# Altium PCB Standby_PS_V2..PcbDoc (part 1 of 2)
Units mm, origin at the board's own origin, x right, y up, seen from the top; angles counter-clockwise.
Board outline 250 x 85 mm, 2 copper layers (Top Layer, Bottom Layer), stack 1.071 mm thick; 195 components, 81 nets, 445 pads, 21 vias.
Unrouted connection lines stored in the file: 2.
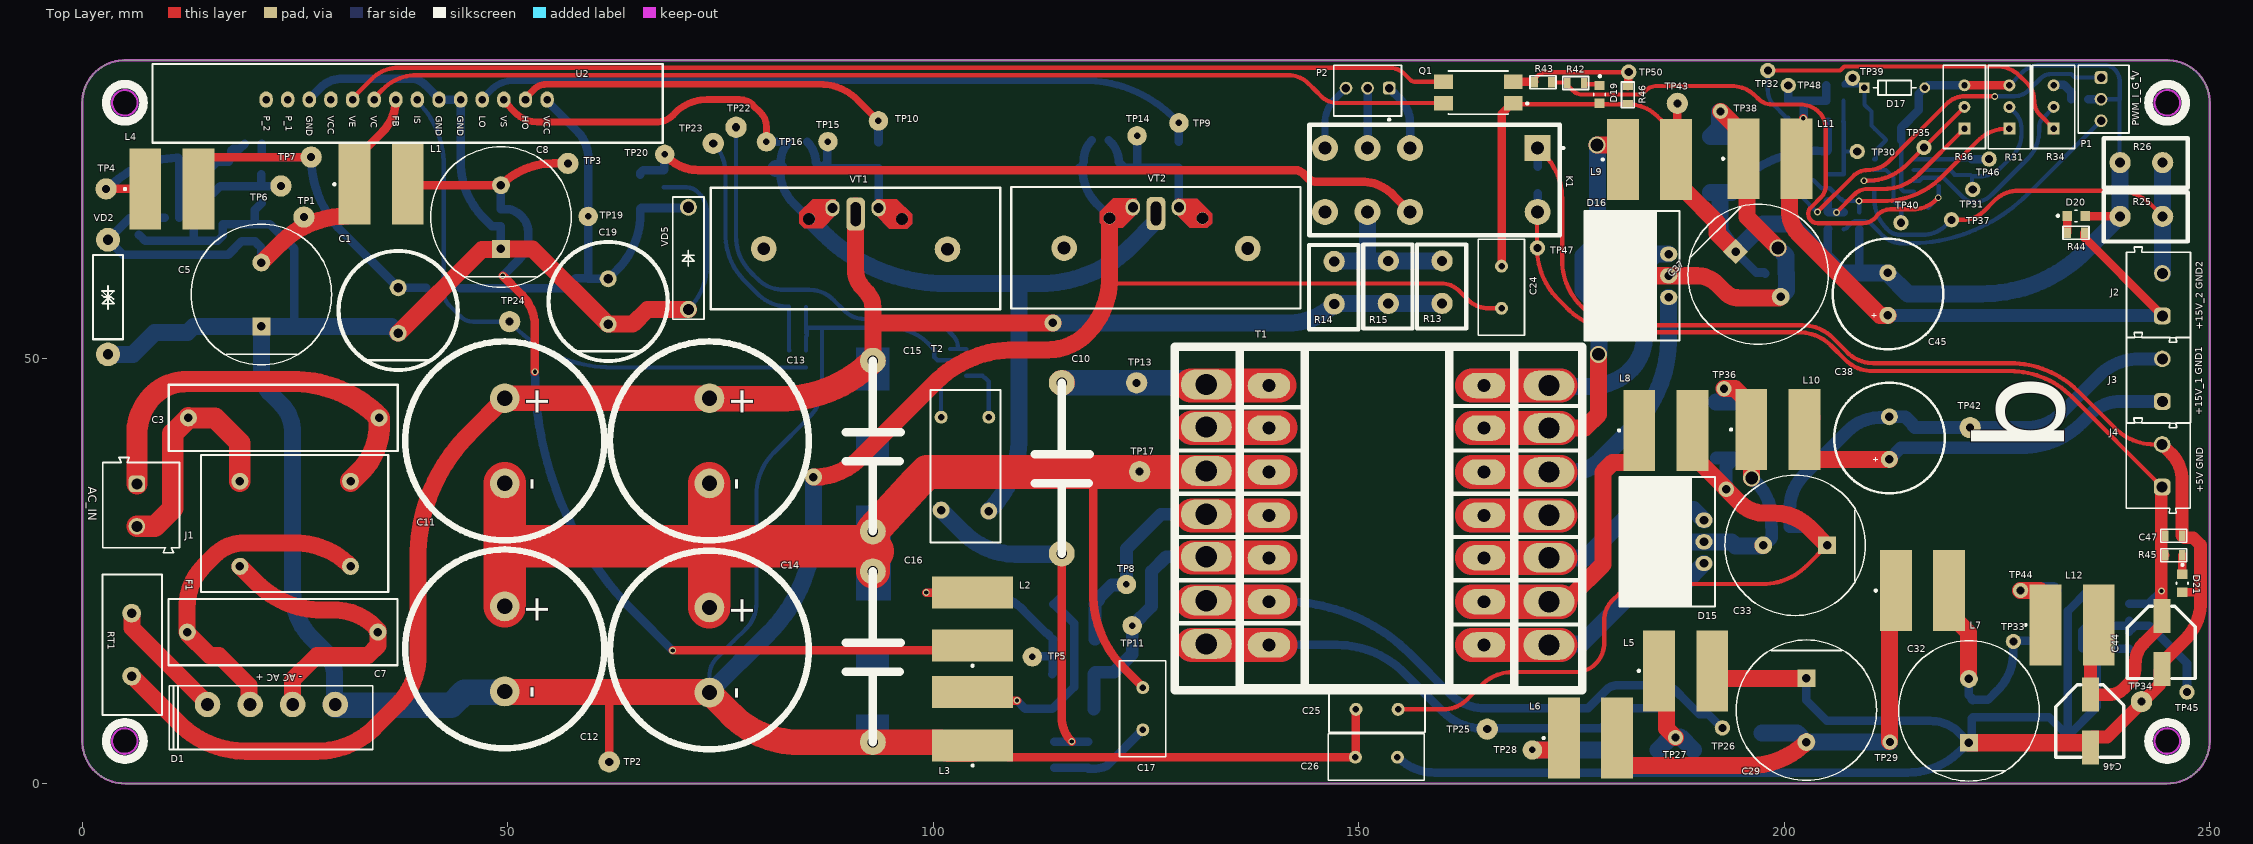
[diagram p0: Top Layer view]
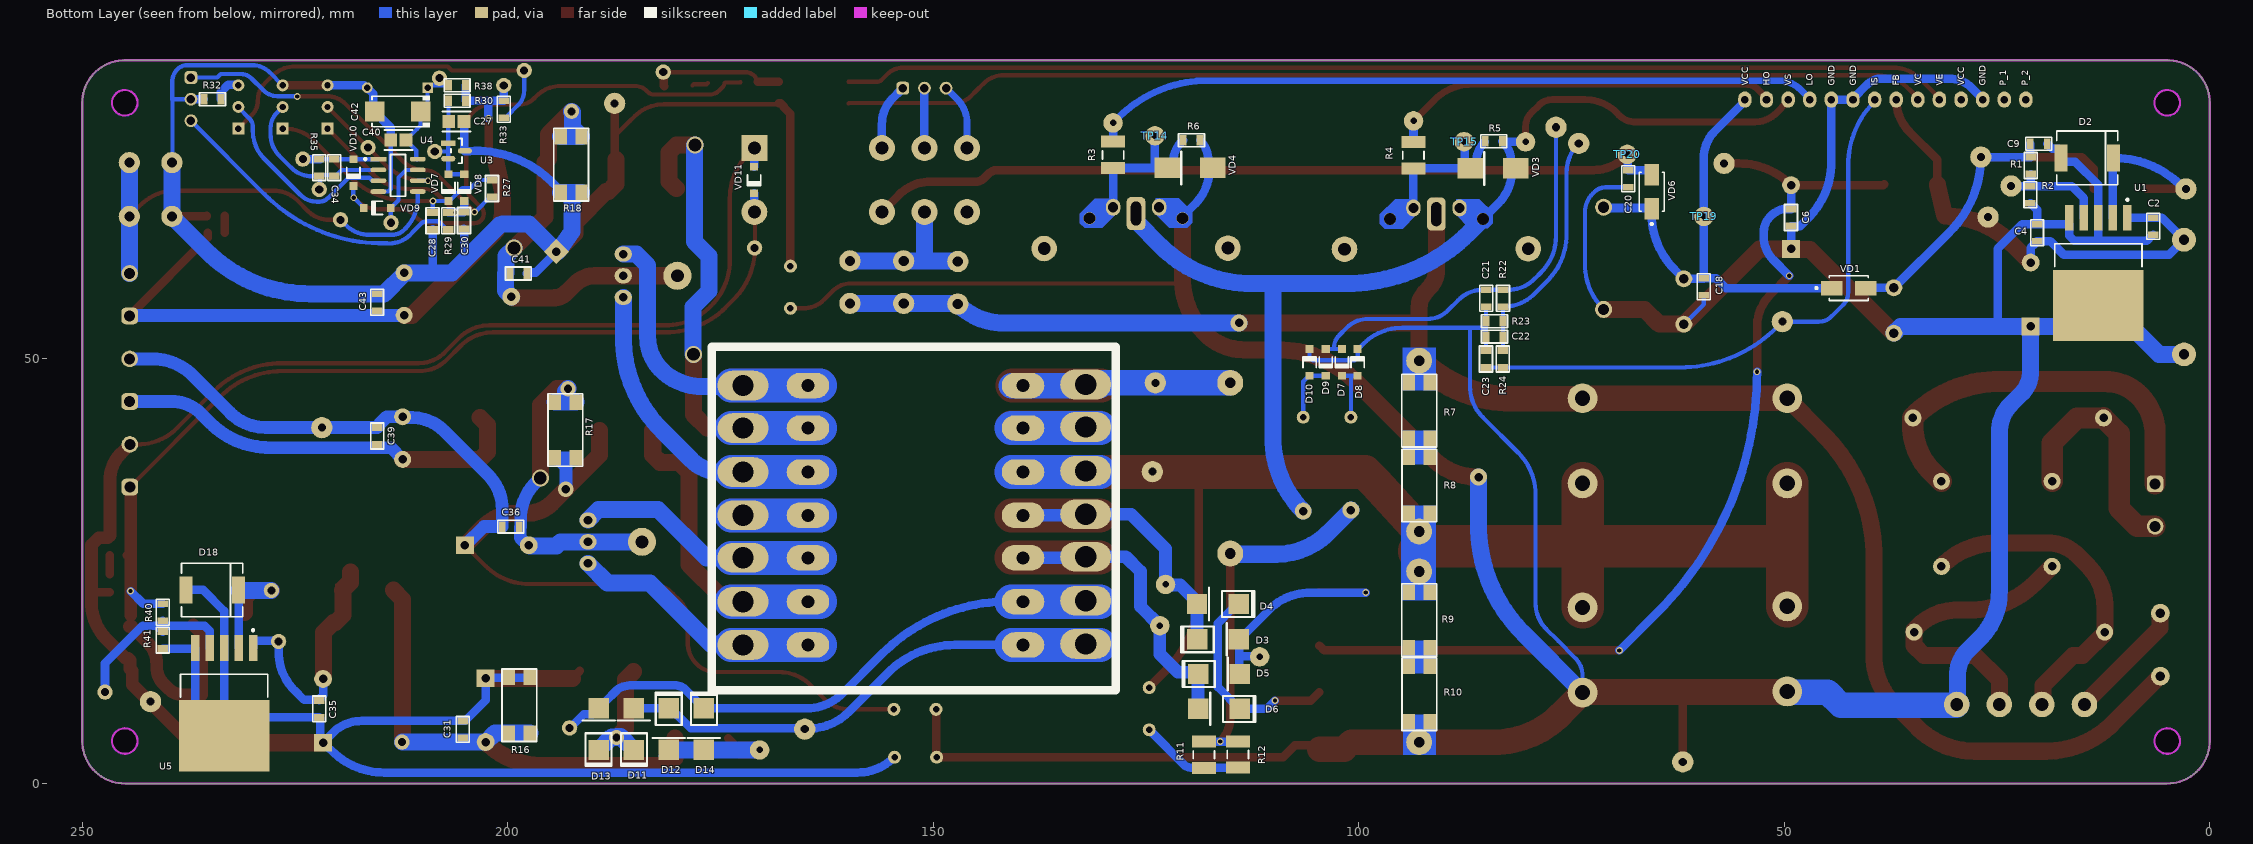
[diagram p1: Bottom Layer view, seen from below]
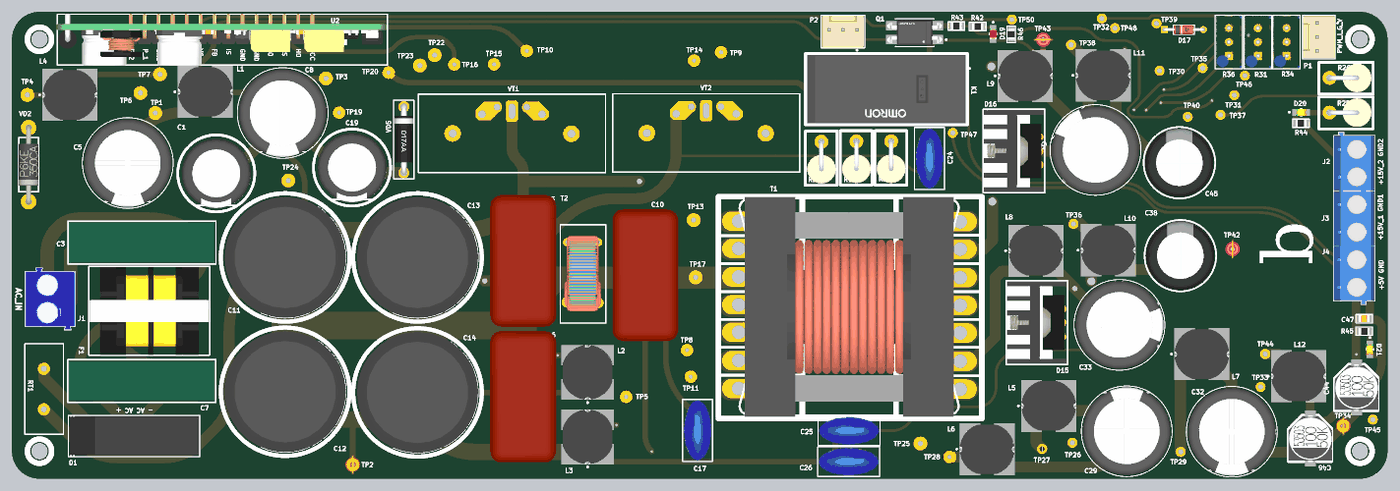
[diagram p3: 3D render of the assembled board from above, using the file's embedded part models]
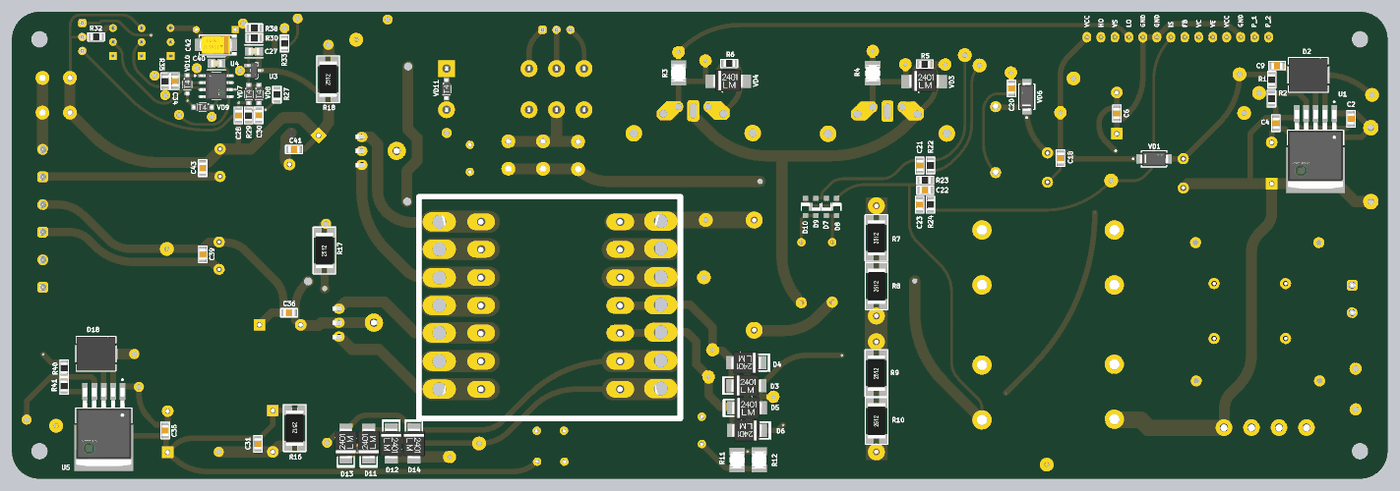
[diagram p4: 3D render of the assembled board from below, using the file's embedded part models]

## Layer stack, top to bottom
Top Solder: solder mask 0.0102, Solder Resist, Dk 3.5
Top Layer: signal copper 0.0356
Dielectric 1: dielectric 1, FR-4, Dk 4.8
Bottom Layer: signal copper 0.0356
Bottom Solder: solder mask 0.0102, Solder Resist, Dk 3.5

## Board outline
0,5 0,80.029 0,80 cw(c5,80) 5,85 245,85 cw(c245,80) 250,80 250,4.95 250,5 cw(c245,5) 245,0 5,0 cw(c5,5)
cut-out: 243.5,80 ccw(c245,80) 245,78.5 ccw(c245,80) 246.5,80 ccw(c245,80) 245,81.5 ccw(c245,80)
cut-out: 243.5,5 ccw(c245,5) 245,3.5 ccw(c245,5) 246.5,5 ccw(c245,5) 245,6.5 ccw(c245,5)
cut-out: 5,78.5 cw(c5,80) 3.5,80 cw(c5,80) 5,81.5 cw(c5,80) 6.5,80 cw(c5,80)
cut-out: 3.5,5 ccw(c5,5) 5,3.5 ccw(c5,5) 6.5,5 ccw(c5,5) 5,6.5 ccw(c5,5)

## Design rules (kind name [scope] priority, off if disabled: settings)
Clearance Clearance_1 [All vs InNet('GND_1')] p1: gap=0.2 ignorepadtopadclearanceinfootprint=FALSE
Clearance [All vs InNet('GND')] p2: gap=0.4 ignorepadtopadclearanceinfootprint=FALSE except(0.2: Arc-Hole SMDPad-SMDPad SMDPad-THPad SMDPad-Via SMDPad-Fill SMDPad-Poly SMDPad-Region SMDPad-Text SMDPad-Hole THPad-THPad THPad-Via THPad-Fill THPad-Poly THPad-Region THPad-Text THPad-Hole Text-Text Text-Hole)
ComponentClearance [All] p1: gap=-3 collisioncheckmode=3 verticalgap=0.254 showdistances=FALSE
DiffPairsRouting [All] p1: maxlimit=0.254 minlimit=0.254 mostfreqgap=0.254 substack1={A23D90DD-733B-49C5-8102-56B3D284E3A0} toplayer_{a23d90dd-733b-49c5-8102-56b3d284e3a0}_minwidth=0.381 toplayer_{a23d90dd-733b-49c5-8102-56b3d284e3a0}_maxwidth=0.381 toplayer_{a23d90dd-733b-49c5-8102-56b3d284e3a0}_prefwidth=0.381 bottomlayer_{a23d90dd-733b-49c5-8102-56b3d284e3a0}_minwidth=0.381 bottomlayer_{a23d90dd-733b-49c5-8102-56b3d284e3a0}_maxwidth=0.381 bottomlayer_{a23d90dd-733b-49c5-8102-56b3d284e3a0}_prefwidth=0.381 toplayer_minwidth=0.381 toplayer_maxwidth=0.381 toplayer_prefwidth=0.381 bottomlayer_minwidth=0.381 bottomlayer_maxwidth=0.381 bottomlayer_prefwidth=0.381 substack2={0B3DB408-A969-412D-8C07-BA8AE97219D9} toplayer_{0b3db408-a969-412d-8c07-ba8ae97219d9}_minwidth=0.381 toplayer_{0b3db408-a969-412d-8c07-ba8ae97219d9}_maxwidth=0.381 toplayer_{0b3db408-a969-412d-8c07-ba8ae97219d9}_prefwidth=0.381 bottomlayer_{0b3db408-a969-412d-8c07-ba8ae97219d9}_minwidth=0.381 bottomlayer_{0b3db408-a969-412d-8c07-ba8ae97219d9}_maxwidth=0.381 bottomlayer_{0b3db408-a969-412d-8c07-ba8ae97219d9}_prefwidth=0.381 substack3={378827E6-B38F-4565-9D2F-710D8D441C30} toplayer_{378827e6-b38f-4565-9d2f-710d8d441c30}_minwidth=0.381 toplayer_{378827e6-b38f-4565-9d2f-710d8d441c30}_maxwidth=0.381 toplayer_{378827e6-b38f-4565-9d2f-710d8d441c30}_prefwidth=0.381 bottomlayer_{378827e6-b38f-4565-9d2f-710d8d441c30}_minwidth=0.381 bottomlayer_{378827e6-b38f-4565-9d2f-710d8d441c30}_maxwidth=0.381 bottomlayer_{378827e6-b38f-4565-9d2f-710d8d441c30}_prefwidth=0.381 substack4={1E65D4A7-266F-4925-B814-5E9C4A66F8EE} toplayer_{1e65d4a7-266f-4925-b814-5e9c4a66f8ee}_minwidth=0.381 toplayer_{1e65d4a7-266f-4925-b814-5e9c4a66f8ee}_maxwidth=0.381 toplayer_{1e65d4a7-266f-4925-b814-5e9c4a66f8ee}_prefwidth=0.381 bottomlayer_{1e65d4a7-266f-4925-b814-5e9c4a66f8ee}_minwidth=0.381 bottomlayer_{1e65d4a7-266f-4925-b814-5e9c4a66f8ee}_maxwidth=0.381 bottomlayer_{1e65d4a7-266f-4925-b814-5e9c4a66f8ee}_prefwidth=0.381 substack5={93C5D03E-862D-45F8-9871-970EEA9B3F11} toplayer_{93c5d03e-862d-45f8-9871-970eea9b3f11}_minwidth=0.381 toplayer_{93c5d03e-862d-45f8-9871-970eea9b3f11}_maxwidth=0.381 toplayer_{93c5d03e-862d-45f8-9871-970eea9b3f11}_prefwidth=0.381 bottomlayer_{93c5d03e-862d-45f8-9871-970eea9b3f11}_minwidth=0.381 bottomlayer_{93c5d03e-862d-45f8-9871-970eea9b3f11}_maxwidth=0.381 bottomlayer_{93c5d03e-862d-45f8-9871-970eea9b3f11}_prefwidth=0.381 maxuncoupledlength=12.7
Height [All] p1: minheight=0 maxheight=50 prefheight=33
HoleSize [All] p1: absolutevalues=TRUE maxlimit=6 minlimit=0.01 maxpercent=80.000 minpercent=20.000
HoleToHoleClearance [All] p1: gap=0.1 allowstackedmicrovias=TRUE
MinimumSolderMaskSliver [All] p1: minsoldermaskwidth=0.1
PlaneClearance [All] p1: clearance=0.7
PlaneConnect [All] p1: planeconnectstyle=Direct reliefexpansion=0.5 reliefentries=4 reliefconductorwidth=0.5 reliefairgap=0.15
PolygonConnect VQFN20 [HasFootprint('VQFN20')] p1: connectstyle=Direct reliefconductorwidth=0.254 reliefentries=4 polygonreliefangle="90 Angle" airgapwidth=0.254
PolygonConnect [All] p2: connectstyle=Direct reliefconductorwidth=0.3 reliefentries=4 polygonreliefangle="90 Angle" airgapwidth=0.15
RoutingVias [All] p1: holewidth=0.1 width=0.1 viastyle="Through Hole" minholewidth=0 minwidth=0.3 maxholewidth=2 maxwidth=4
ShortCircuit [All] p1: allowed=TRUE
SilkToSolderMaskClearance [IsPad] p1: minsilkscreentomaskgap=0.1 clearancetoexposedcopper=TRUE
SolderMaskExpansion SolderMaskExpansion_Via [IsVia] p1: expansion=0.102 istentingtop=TRUE
SolderMaskExpansion [All] p2: expansion=0.01 istentingtop=FALSE
UnRoutedNet [All] p1: checkbadconnections=TRUE
Width [All] p1: maxlimit=5 minlimit=0.2 preferedwidth=0.3 substack1={A23D90DD-733B-49C5-8102-56B3D284E3A0} substack2={0B3DB408-A969-412D-8C07-BA8AE97219D9} substack3={378827E6-B38F-4565-9D2F-710D8D441C30} substack4={1E65D4A7-266F-4925-B814-5E9C4A66F8EE} substack5={93C5D03E-862D-45F8-9871-970EEA9B3F11}
19 further rules are at their usual default settings.

## Components (designator, comment, footprint, x,y, rotation, side; value= is the part's Value field where it differs from the comment)
C1 "2200uF_25V" CAP_POL_13x26_1000uF_50V 37.125,55.592 r270 top locked
C2 "0.1uF" CAP-0805 6.65,65.5 r90 bottom
C3 "CAP-NON-POLAR" CAP-V15 23.675,42.975 r180 top
C4 "1uF_50V" CAP-0805 20.289,64.725 r90 bottom
C5 "1000uF 50V" FP-RAD-TH-D_16_0_5-L_25_2-MFG 21.048,57.475 r90 top
C6 "1uF_50V" CAP-0805 49.2,66.513 r270 bottom
C7 "CAP-NON-POLAR" CAP-V15 23.55,17.8 r0 top
C8 "1000uF 50V" FP-RAD-TH-D_16_0_5-L_25_2-MFG 49.2,66.575 r90 top locked
C9 "0.1uF" CAP-0805 20.1,75.2 r0 bottom
C10 "CAP-NON-POLAR" CAP_3.3uF_630V 115.1,37.063 r90 top
C11 "CAP-POLAR" "CAP 100uF_500V 22x40mm" 49.65,40.275 r270 top locked
C12 "CAP-POLAR" "CAP 100uF_500V 22x40mm" 49.65,15.825 r270 top
C13 "CAP-POLAR" "CAP 100uF_500V 22x40mm" 73.7,40.275 r270 top
C14 "CAP-POLAR" "CAP 100uF_500V 22x40mm" 73.7,15.7 r270 top locked
C15 "CAP-NON-POLAR" CAP_3.3uF_630V 92.9,39.658 r90 top
C16 "CAP-NON-POLAR" CAP_3.3uF_630V 92.9,14.9 r90 top
C17 "CAP-V" CAP-V 124.625,8.8 r90 top
C18 "1uF_50V" CAP-0805 59.45,58.375 r270 bottom
C19 "2200uF_25V" CAP_POL_13x26_1000uF_50V 61.8,56.65 r270 top
C20 "1uF 50V" CAP-0805 68.325,71.067 r90 bottom
C21 "1uF 16V" CAP-0805 85.017,57.025 r90 bottom
C22 "1UF 16V" CAP-0805 84.042,52.525 r180 bottom
C23 "1UF 16V" CAP-0805 85.042,49.9 r270 bottom
C24 "" CAP-V 166.775,58.325 r90 top
C25 "" CAP-V 152.15,8.725 r0 top
C26 "" CAP-V 152.075,3.1 r0 top
C27 "50V 1uF" FP-C0805C-DN-IPC_A 206.041,77.8 r0 bottom value="0.22 μF"
C28 "0.1uF" CAP-0805 208.841,66.125 r90 bottom
C29 "1000uF 50V" FP-RAD-TH-D_16_0_5-L_25_2-MFG 202.6,8.625 r270 top locked
C30 "0.1uF" CAP-0805 205.144,66.175 r90 bottom
C31 "1uF_50V" CAP-0805 205.3,6.365 r90 bottom
C32 "1000uF 50V" FP-RAD-TH-D_16_0_5-L_25_2-MFG 221.7,8.55 r90 top locked
C33 "1000uF 50V" FP-RAD-TH-D_16_0_5-L_25_2-MFG 201.275,28 r180 top
C34 "0.1uF" CAP-0805 220.375,72.382 r270 bottom
C35 "1uF_50V" CAP-0805 222.15,8.775 r270 bottom
C36 "0.1uF" CAP-0805 199.646,30.2 r180 bottom
C37 "1000uF 50V" FP-RAD-TH-D_16_0_5-L_25_2-MFG 196.925,59.85 r315 top locked
C38 "2200uF_25V" CAPPOL-12x25 212.35,40.6 r90 top
C39 "0.1uF" CAP-0805 215.325,40.85 r270 bottom
C40 "50V 1uF" FP-C0805C-DN-IPC_A 212.841,75.625 r0 bottom value="0.22 μF"
C41 "1uF 50V" CAP-0805 198.75,59.933 r0 bottom
C42 "CAP-POLAR" CAP-TAN-C 212.941,78.975 r0 bottom
C43 "1uF 50V" CAP-0805 215.35,56.55 r270 bottom
C44 "1000uF 6.3V" CAP_SMD_Size_E 244.375,16.535 r90 top
C45 "2200uF_25V" CAPPOL-12x25 212.175,57.525 r90 top locked
C46 "1000uF 6.3V" CAP_SMD_Size_E 235.975,7.275 r90 top
C47 "1uF_50V" CAP-0805 245.768,29.125 r0 top
D1 "RS40X" RS40X 22.225,7.8 r180 top locked
D2 "SS36" SMC/DO214AB 14.395,73.525 r0 bottom
D3 "US1G" DO-214AA#1 114.5,16.95 r0 bottom
D4 "US1G" DO-214AA#1 118.625,21.1 r180 bottom
D5 "US1G" DO-214AA#1 114.375,12.875 r0 bottom
D6 "US1G" DO-214AA#1 118.475,8.775 r180 bottom
D7 "1N4148W-7-F" DIOD-SOD123-2_V#1 101.975,49.5 r270 bottom
D8 "1N4148W-7-F" DIOD-SOD123-2_V#1 100.125,49.5 r90 bottom
D9 "1N4148W-7-F" DIOD-SOD123-2_V#1 103.875,49.5 r270 bottom
D10 "1N4148W-7-F" DIOD-SOD123-2_V#1 105.775,49.5 r90 bottom
D11 "US1G" DO-214AA#1 185.175,8.45 r270 bottom
D12 "US1G" DO-214AA#1 181.075,4.35 r90 bottom
D13 "US1G" DO-214AA#1 189.325,8.45 r270 bottom
D14 "US1G" DO-214AA#1 176.95,4.35 r90 bottom
D15 "U1620G" TO-220_Bended_Rad 187.525,28.92 r90 top
D16 "U1620G" TO-220_Bended_Rad 183.375,60.183 r90 top locked
D17 "5,6V" FP-SB-V-3906_04-031_4-MFG 212.971,81.775 r0 top
D18 "SS36" SMC/DO214AB 234.725,22.75 r0 bottom
D19 "RED" LED_RED 178.3,80.975 r270 top
D20 "GREEN" LED_GREEN 234.3,66.7 r0 top
D21 "GREEN" LED_GREEN 246.768,23.548 r270 top
F1 "FILTER" FILTER_1 25.025,30.525 r0 top
J1 "691101710002" 691101710002 6.925,32.725 r270 top
J2 "691102710002" 691102710002 243.975,57.45 r90 top locked
J3 "691102710002" 691102710002 243.975,47.4 r90 top locked
J4 "691102710002" 691102710002 243.95,37.35 r90 top locked
K1 "" Relay_F1CA005V_Omron 158.925,70.925 r180 top locked
L1 "1.2µH, 7.4A" WE-PD2_1054 35.125,70.425 r0 top
L2 "1.2µH, 7.4A" WE-PD2_1054 104.625,19.35 r90 top
L3 "1.2µH, 7.4A" WE-PD2_1054 104.625,7.625 r90 top
L4 "22µH, 2.04A" WE-PD2_1054 10.525,69.875 r0 top
L5 "1.2µH, 7.4A" WE-PD2_1054 188.416,13.25 r0 top
L6 "1.2µH, 7.4A" WE-PD2_1054 177.225,5.35 r0 top
L7 "1.2µH, 7.4A" WE-PD2_1054 216.25,22.675 r0 top
L8 "1.2µH, 7.4A" WE-PD2_1054 186.086,41.5 r0 top
L9 "1.2µH, 7.4A" WE-PD2_1054 184.175,73.325 r0 top locked
L10 "1.2µH, 7.4A" WE-PD2_1054 199.25,41.6 r0 top
L11 "1.2µH, 7.4A" WE-PD2_1054 198.325,73.425 r0 top
L12 "22µH, 2.04A" WE-PD2_1054 233.833,18.65 r0 top
P1 "61900311121" 61900311121 237.525,80.425 r90 top
P2 "61900311121" 61900311121 151.035,81.425 r0 top
Q1 "PC817XNNIP0F" FP-PC817XNNIP0F-MFG 164.05,81.2 r180 top
R1 "1K" RES-0805 21.051,72.625 r90 bottom
R2 "1K*" RES-0805 21.076,69.2 r90 bottom
R3 "22" RES_SMD_1210_IPC_A 128.867,73.875 r270 bottom
R4 "22" RES_SMD_1210_IPC_A 93.572,73.829 r270 bottom
R5 "1K" RES-0805 84.125,75.475 r180 bottom
R6 "1K" RES-0805 119.65,75.6 r180 bottom
R7 "100K" RES-2512 92.9,43.838 r90 bottom
R8 "100K" RES-2512 92.875,35.05 r90 bottom
R9 "100K" RES-2512 92.9,19.221 r90 bottom
R10 "100K" RES-2512 92.875,10.525 r90 bottom
R11 "RES_1210" RES_SMD_1210_IPC_A 118.2,3.393 r270 bottom
R12 "RES_1210" RES_SMD_1210_IPC_A 114.2,3.418 r270 bottom
R13 "15K" RES-2W_2 159.787,56.425 r270 top
R14 "15K" RES-2W_2 147.112,56.35 r270 top
R15 "15K" RES-2W_2 153.475,56.425 r270 top
R16 "100K" RES-2512 198.625,9.2 r270 bottom
R17 "100" RES-2512 193.225,41.55 r90 bottom
R18 "100" RES-2512 192.55,72.745 r90 bottom
R22 "1K*" RES-0805 83.042,57.025 r270 bottom
R23 "1K" RES-0805 84.042,54.325 r0 bottom
R24 "1K*" RES-0805 83.067,49.9 r270 bottom
R25 "1.1 Ohm***" RES-2W_2 244.461,66.65 r0 top
R26 "1.1 Ohm***" RES-2W_2 244.461,72.975 r0 top
R27 "1K" RES-0805 201.841,69.925 r90 bottom
R29 "1K" RES-0805 206.991,66.125 r90 bottom
R30 "10K" RES-0805 205.952,80.225 r180 bottom
R31 "10K" RES_Adj_3296W_Bourns 226.45,79.5 r0 top
R32 "1K*" RES-0805 234.7,80.425 r180 bottom
R33 "10K" RES-0805 200.466,79.25 r90 bottom
R34 "10K" RES_Adj_3296W_Bourns 231.65,79.51 r0 top
R35 "10K (1K)" RES-0805 222.15,72.382 r270 bottom
R36 "10K" RES_Adj_3296W_Bourns 221.175,79.51 r0 top
R38 "1K" RES-0805 205.952,82.05 r180 bottom
R40 "3K" RES-0805 240.525,20.127 r90 bottom
R41 "1K*" RES-0805 240.525,16.86 r90 bottom
R42 "1K" RES-0805 175.5,82.325 r180 top
R43 "1K" RES-0805 171.65,82.425 r180 top
R44 "2.7K" RES-0805 234.275,64.725 r0 top
R45 "1K" RES-0805 245.768,26.823 r180 top
R46 "5.1K" RES-0805 181.625,80.925 r90 top
RT1 "RES-TEMP" 10D-15 5.8,16.325 r90 top
T1 "ETD34" Transformer_ETD34 152.15,31.275 r0 top locked
T2 "Current_SENS" Current_Sense_13x7x5 103.725,37.35 r270 top
TP1 "" Test_Point#1 26.05,66.575 r0 top
TP2 "Test_Point_PCB" Pin_Test_Point(Orange) 61.925,2.55 r0 top
TP3 "" Test_Point#1 57.071,72.875 r0 top
TP4 "" Test_Point#1 2.8,69.875 r0 top
TP5 "" Test_Point#2 111.641,14.9 r90 top
TP6 "" Test_Point#1 23.35,70.225 r0 top
TP7 "" Test_Point#1 26.9,73.625 r0 top
TP8 "" Test_Point#2 122.7,23.4 r90 top
TP9 "" Test_Point#2 128.871,77.638 r90 top
TP10 "" Test_Point#2 93.562,77.875 r90 top
TP11 "" Test_Point#2 123.375,18.55 r90 top
TP13 "" Test_Point#1 123.9,47.096 r90 top
TP14 "" Test_Point#2 123.95,76.125 r90 bottom
TP15 "" Test_Point#2 87.625,75.429 r0 bottom
TP16 "" Test_Point#2 80.4,75.416 r90 top
TP17 "" Test_Point#1 124.25,36.65 r90 top
TP19 "Test_Point_PCB" Test_Point#2 59.45,66.647 r180 bottom
TP20 "Test_Point_PCB" Test_Point#2 68.45,73.939 r180 bottom
TP22 "Test_Point_PCB" Test_Point#1 76.825,77.123 r90 top
TP23 "Test_Point_PCB" Test_Point#1 74.15,75.229 r90 top
TP24 "Test_Point_PCB" Test_Point#1 50.225,54.28 r90 top
TP25 "Test_Point_PCB" Test_Point#1 165.1,6.4 r90 top
TP26 "Test_Point_PCB" Test_Point#3 192.725,6.55 r90 top
TP27 "Test_Point_PCB" Test_Point#3 187.225,5.416 r90 top
TP28 "" Test_Point#2 170.4,3.95 r180 top
TP29 "Test_Point_PCB" Test_Point#3 212.423,4.875 r270 top
TP30 "Test_Point_PCB" Test_Point#3 208.575,74.275 r90 top
TP31 "Test_Point_PCB" Test_Point#3 222.15,69.825 r90 top
TP32 "Test_Point_PCB" Test_Point#3 198.065,83.799 r90 top
TP33 "Test_Point_PCB" Test_Point#3 226.925,16.705 r270 top
TP34 "Test_Point_PCB" Pin_Test_Point(Orange) 241.975,9.625 r0 top
TP35 "Test_Point_PCB" Test_Point#3 216.408,74.743 r90 top
TP36 "Test_Point_PCB" Test_Point#3 192.925,46.4 r90 top
TP37 "Test_Point_PCB" Test_Point#3 219.65,66.25 r90 top
TP38 "Test_Point_PCB" Test_Point#3 192.5,79 r90 top
TP39 "Test_Point_PCB" Test_Point#3 208.025,82.894 r90 top
TP40 "Test_Point_PCB" Test_Point#3 213.7,65.9 r90 top
TP42 "Test_Point_PCB" Pin_Test_Point(Pink) 221.844,41.825 r0 top
TP43 "Test_Point_PCB" Pin_Test_Point(Pink) 187.439,79.93 r270 top
TP44 "" Test_Point#3 227.775,22.7 r270 top
TP45 "" Test_Point#3 247.325,10.75 r90 top
TP46 "Test_Point_PCB" Test_Point#3 224.075,73.38 r90 top
TP47 "" Test_Point#3 170.993,62.95 r270 top
TP48 "Test_Point_PCB" Test_Point#3 200.466,82.04 r90 top
TP50 "Test_Point_PCB" Test_Point#3 181.724,83.6 r90 top
U1 "" ON_Semiconductor_936A-02_MFG 13.091,60.006 r0 bottom
U2 "TL494_Ir2181" PWM_Controller_Half 68.087,82.788 r180 top
U3 "" TL431_SOT-23-3(A) 206.016,74.347 r180 bottom
U4 "LM358DR2G" FP-751-07-IPC_C 212.891,71.475 r180 bottom
U5 "" ON_Semiconductor_936A-02_MFG 233.325,9.425 r0 bottom
VD1 "US1G" US1G_SMA 42.425,58.225 r180 bottom
VD2 "P6KE40" P6KE350CA 3.025,57.175 r90 top
VD3 "SMBJ15A" DO-214AA#2 86.503,72.3 r180 bottom
VD4 "SMBJ15A" DO-214AA#2 122.125,72.35 r180 bottom
VD5 "15V" DO-017AA 71.225,61.725 r270 top
VD6 "US1G" US1G_SMA 65.575,69.548 r90 bottom
VD7 "" DIOD-SOD123-2_V#2 206.966,70.025 r270 bottom
VD8 "" DIOD-SOD123-2_V#2 205.116,70.025 r270 bottom
VD9 "" DIOD-SOD123-2_V#2 215.341,67.65 r0 bottom
VD10 "" DIOD-SOD123-2_V#2 218.141,71.8 r270 bottom
VD11 "" DIOD-SOD123-2_V#2 171.05,70.925 r270 bottom
VT1 "MOSFET-N-GDS" RAD_TO-220-TO247 90.88,62.851 r180 top locked
VT2 "MOSFET-N-GDS" RAD_TO-220-TO247 126.175,62.925 r180 top locked

## Footprints (in the part's own frame and the unit in brackets; to place one, negate y for a bottom-side part, rotate by r counter-clockwise, add the part's x,y. Pads: shape width x height; smd on the part's side, far side on the other; paste and mask are expansions set on the pad)
10D-15 [mm]
  round 2.2 hole 1.12: 1(-3.7,0) 2(3.7,0)
  silkscreen extent -8.25,-3.56 8.25,3.43, body extent -8.25,-3.5 8.25,3.5, height 21.24
61900311121 [mm] "2.54mm Male Locking Header, 3p"
  rrect50% 1.5x1.5 hole 1: 1(2.54,0.3)
  round 1.5 hole 1: 2(0,0.3) 3(-2.54,0.3)
  silkscreen extent -3.98,-3.52 3.98,2.98, body extent -3.81,-2.9 3.81,2.9, height 11.53
691101710002 [mm] "5,00mm - modular - blue - Horizontal entry with pressure clamp - 12,6mm height - 02p"
  rrect50% 1.95x1.95 hole 1.3: 1(-2.5,-0.5)
  round 1.95 hole 1.3: 2(2.5,-0.5)
  silkscreen extent -5.6,-4.5 5.6,4.5, body extent -5.6,-4.5 5.6,4.5, height 12.65
691102710002 [mm] "5,00mm - modular - blue - Horizontal entry with pressure clamp - 9,9 mm height - 02p"
  rrect50% 1.95x1.95 hole 1.3: 1(-2.5,-0.45)
  round 1.95 hole 1.3: 2(2.5,-0.45)
  silkscreen extent -5.6,-3.75 5.6,3.75, body extent -5.6,-3.75 5.6,3.75, height 9.96
"CAP 100uF_500V 22x40mm" [mm]
  round 3.5 hole 1.8: 1(-5,0) 2(5,0)
  silkscreen extent -11.68,-11.68 11.68,11.68, body extent -11,-11 11.1,11.1, height 31.53
CAP-0805 [mm]
  rect 0.8x1.25 smd mask+0.015: 1(-1,0) 2(1,0)
  silkscreen extent -1.52,-0.76 1.52,0.76, body extent -1,-0.62 1,0.63, height 0.8
CAP-TAN-C [mm]
  rect 2.3x2.3 smd: 1(-2.7,0) 2(2.7,0)
  silkscreen extent -3.8,-1.9 3,1.9, body extent -2.9,-1.6 2.9,1.6, height 2.6
CAP-V [mil]
  round 60 hole 30: 1(-97.44,0) 2(97.44,0)
  silkscreen extent -222,-106 221,108, body extent -216,-98 216,98, height 610
CAP-V15 [mm]
  round 2 hole 1: 1(-11.2,0) 2(11.2,0)
  silkscreen extent -13.4,-3.9 13.5,3.9, body extent -13.2,-3.72 13.3,3.7, height 17
CAP_3.3uF_630V [mil]
  round 120 hole 50: 1(-395,0) 2(395,0)
  silkscreen extent -395,-130 395,125, body extent -472,-236 472,236, height 804
CAP_POL_13x26_1000uF_50V [mm]
  round 2 hole 1.1: 1(-2.667,0) 2(2.667,0)
  silkscreen extent -7,-7 7,7, body extent -6.3,-6.3 6.31,6.31, height 25.72
CAP_SMD_Size_E [mm]
  rect 4x2 smd: 1(3.175,0) 2(-3.048,0)
  silkscreen extent -4.19,-3.94 4.32,4.06, body extent -4.25,-4 4.25,4, height 10.59
CAPPOL-12x25 [mm]
  round 2 hole 1: 1(-2.5,0) 2(2.5,0)
  silkscreen extent -6.5,-6.5 6.5,6.5, body extent -6.25,-6.25 6.25,6.25, height 25
Current_Sense_13x7x5 [mm]
  round 2 hole 1: 1(5.334,2.8) 2(5.207,-2.8)
  round 1.524 hole 0.762: 3(-5.7,2.8) 4(-5.7,-2.794)
  silkscreen extent -8.89,-4.06 9.02,4.19, body extent -12.58,-3.35 12.34,3.35, height 17.72
DIOD-SOD123-2_V#1 [mm] "SOD123, 2-Leads, Body 2.7x1.55mm, Height 1.45mm"
  rect 0.9x0.95 smd: 1(-1.575,0) 2(1.575,0)
  silkscreen extent -0.64,-0.83 0.64,0.77, body extent -1.35,-0.77 1.35,0.77, height 1.45
DIOD-SOD123-2_V#2 [mm] "SOD123, 2-Leads, Body 2.7x1.55mm, Height 1.45mm"
  rect 0.9x0.95 smd: 1(1.575,0) 2(-1.575,0)
  silkscreen extent -0.64,-0.82 0.64,0.77, body extent -1.88,-0.8 1.88,0.8, height 1.3
DO-017AA [mm]
  round 2 hole 1.3: 1(-6,0) 2(6,0)
  silkscreen extent -7.2,-1.85 7.15,1.83, body extent -6.63,-1.7 6.37,1.7, height 3.4
DO-214AA#1 [mm]
  rect 2.4x2.4 smd: 1(-0.381,0) 2(4.5,0)
  silkscreen extent 1.02,-1.91 6.35,1.91, body extent -0.75,-1.97 4.85,1.97, height 2.65
DO-214AA#2 [mm]
  rect 3x2.4 smd: 1(-0.381,0) 2(4.953,0)
  silkscreen extent 1.27,-1.91 1.27,1.91, body extent -0.53,-1.85 5.07,2.1, height 2.65
FILTER_1 [mm]
  round 2 hole 1: 1(-6.5,5) 2(6.5,5) 3(6.5,-5) 4(-6.5,-5)
  silkscreen extent -11.05,-8.03 10.92,8.1, body extent -10.95,-8 10.85,8, height 24.48
FP-751-07-IPC_C [mm]
  rect 1.874x0.543 smd paste+0 mask+0: 1(-2.316,1.905)
  rrect100% 1.874x0.543 smd paste+0 mask+0: 2(-2.316,0.635) 3(-2.316,-0.635) 4(-2.316,-1.905) 5(2.316,-1.905) 6(2.316,-0.635) 7(2.316,0.635) 8(2.316,1.905)
  silkscreen extent -3.98,-2.45 0.88,2.45, body extent -3,-2.45 3,2.45, height 1.75
FP-C0805C-DN-IPC_A [mm]
  rect 1.505x1.556 smd paste+0 mask+0: 1(-0.901,0) 2(0.901,0)
  silkscreen extent -1.65,-1.18 1.65,1.18, body extent -1,-0.63 1,0.63, height 0.88
FP-PC817XNNIP0F-MFG [mm]
  rect 2.2x1.7 smd paste+0 mask+0: 1(-4.1,1.27) 2(-4.1,-1.27) 3(4.1,-1.27) 4(4.1,1.27)
  silkscreen extent -5.88,-2.54 3.5,2.54, body extent -5.3,-2.64 5.3,2.64, height 0.25
FP-RAD-TH-D_16_0_5-L_25_2-MFG [mm]
  round 2.1 hole 1 paste-2539.97 mask+0: 1(3.75,0)
  rect 2.1x2.1 hole 1 paste-2539.97 mask+0: 2(-3.75,0)
  silkscreen extent -8.25,-8.25 8.25,8.25, body extent -8.35,-8.35 8.35,8.35, height 0.25
FP-SB-V-3906_04-031_4-MFG [mm]
  rect 1.25x1.25 hole 0.75 paste-2539.97 mask+0: 1(-3.55,0)
  round 1.25 hole 0.75 paste-2539.97 mask+0: 2(3.55,0)
  silkscreen extent -2.52,-0.85 2.52,0.85, body extent -4.28,-0.95 4.28,0.95, height 0.25
LED_GREEN [mm]
  rect 1.1x1.2 smd paste+0 mask+0: 1(-1.05,0) 2(1.05,0)
  silkscreen extent -2.27,-0.67 0.13,0.67, body extent -1,-0.63 1,0.63, height 0.8
LED_RED [mm]
  rect 1.1x1.2 smd paste+0 mask+0: 1(-1.05,0) 2(1.05,0)
  silkscreen extent -2.27,-0.67 0.13,0.67, body extent -1.7,-0.77 1.7,0.77, height 0.25
ON_Semiconductor_936A-02_MFG [mm]
  rect 1.016x3.05 smd paste+0 mask+0: 1(-3.404,-6.485) 2(-1.702,-6.485) 3(0,-6.485) 4(1.702,-6.485) 5(3.404,-6.485)
  rect 10.66x8.38 smd paste+0 mask+0: 6(0,3.82)
  silkscreen extent -5.12,-8.72 5.12,-0.75, body extent -5.01,-7.11 5.01,7.14, height 4.83
P6KE350CA [mm]
  round 2.8 hole 1.2: 1(-6.731,0) 2(6.731,0)
  silkscreen extent -4.95,-1.78 4.95,1.78, body extent -7.26,-1.8 7.26,1.8, height 6.9
Pin_Test_Point(Orange) [mm]
  round 2.5 hole 0.95: 1(0,0)
  body extent -1.3,-1.78 1.3,1.78, height 6.93
Pin_Test_Point(Pink) [mm]
  round 2.5 hole 0.95: 1(0,0)
  body extent -1.3,-1.78 1.3,1.78, height 6.93
PWM_Controller_Half [mil]
  oval 62x75 hole 35: 1(530,95) 2(630,95) 3(730,95) 4(830,95) 5(930,95) 6(1030,95) 7(1130,95) 8(1230,95) 9(1330,95) 10(1430,95) 11(1530,95) 12(1630,95) 13(1730,95) 14(1830,95)
  silkscreen extent -5,-70 2355,295, body extent 0,-75 2362,299, height 203
RAD_TO-220-TO247 [mm]
  round 3 hole 1.5: 0(-10.795,0.051) 0(10.795,0)
  round 1.425 hole 1.4: 1(-5.461,-3.505) 3(5.461,-3.505)
  oval 1.7x2 hole 1.2: 1(-2.692,-4.8) 3(2.718,-4.8)
  rrect50% 2.2x3.9 hole 1.2 slot 2.8 at 90 deg: 2(0,-4.064)
  Top Layer region: 2.311,-5.842 2.311,-3.988 3.886,-2.413 6.02,-2.413 6.604,-2.997 6.604,-4.267 5.029,-5.842
  Top Layer region: -4.851,-5.816 -6.629,-4.038 -6.629,-2.946 -6.045,-2.362 -3.962,-2.362 -2.413,-3.911 -2.413,-5.816
  Bottom Layer region: 2.311,-5.842 2.311,-3.988 3.886,-2.413 6.02,-2.413 6.604,-2.997 6.604,-4.267 5.029,-5.842
  Bottom Layer region: -4.851,-5.816 -6.629,-4.038 -6.629,-2.946 -6.045,-2.362 -3.962,-2.362 -2.413,-3.911 -2.413,-5.816
  silkscreen extent -16.99,-7.16 17.02,7.11, body extent -17,-7.19 17,7.19, height 25.75
Relay_F1CA005V_Omron [mil]
  rect 120x120 hole 60 paste-99999 mask+0: 1(-476.38,-147.64)
  round 120 hole 60 paste-99999 mask+0: 2(114.17,-147.64) 3(311.02,-147.64) 4(507.87,-147.64) 5(507.87,147.64) 6(311.02,147.64) 7(114.17,147.64) 8(-476.38,147.64)
  silkscreen extent -599,-255 580,255, body extent -575,-254 575,254, height 10
RES-2W_2 [mm]
  round 2.5 hole 1.2: 1(-5,0) 2(0,0)
  silkscreen extent -6.93,-2.95 2.95,2.85, body extent -5.4,-2.6 2.6,2.6, height 21.6
RES-0805 [mm]
  rect 0.8x1.25 smd mask+0.015: 1(-1,0) 2(1,0)
  silkscreen extent -1.52,-0.76 1.52,0.76, body extent -1,-0.62 1,0.63, height 0.6
RES-2512 [mm]
  rect 1.8x1.45 smd: 1(-3.275,-1.225) 1(-3.275,1.225) 2(3.275,-1.225) 2(3.275,1.225)
  silkscreen extent -4.28,-2.05 4.25,2.05, body extent -3.2,-1.6 3.2,1.6, height 0.6
RES_Adj_3296W_Bourns [mm]
  rect 1.4x1.4 hole 0.75 paste-2539.97 mask+0: 1(0,-2.54)
  round 1.4 hole 0.75 paste-2539.97 mask+0: 2(0,0) 3(0,2.54)
  silkscreen extent -2.49,-4.89 2.47,4.89, body extent -2.59,-4.99 2.57,4.99, height 0.25
RES_SMD_1210_IPC_A [mm]
  rect 1.405x2.806 smd paste+0 mask+0: 1(-1.551,0) 2(1.551,0)
  silkscreen extent -0.47,-1.25 0.47,1.25, body extent -1.6,-1.25 1.6,1.25, height 0.6
RS40X [mm]
  round 3 hole 1.5: 1(-7.5,-1.5) 2(-2.5,-1.5) 3(2.5,-1.5) 4(7.5,-1.5)
  silkscreen extent -11.9,-3.7 12,3.8, body extent -11.81,-3.55 11.81,3.55, height 19.76
SMC/DO214AB [mm]
  rect 1.52x3.2 smd: 1(-3.105,0) 2(3.105,0)
  silkscreen extent -3.6,-3.15 3.6,3.15, body extent -3.77,-3.11 3.77,3.11, height 2.62
Test_Point#1 [mm]
  round 2.5 hole 0.95: 1(0,0)
Test_Point#2 [mm]
  round 2.286 hole 0.762 paste-2539.97 mask+0.102: 1(0,0)
Test_Point#3 [mm]
  round 1.8 hole 0.95: 1(0,0)
TL431_SOT-23-3(A) [mm]
  rect 1.659x0.627 smd paste+0 mask+0: 1(-0.977,0.915)
  rrect100% 1.659x0.627 smd paste+0 mask+0: 2(-0.977,-0.915) 3(0.977,0)
  silkscreen extent -0.65,-1.45 0.65,1.45, body extent -1.2,-1.45 1.2,1.45, height 1.1
TO-220_Bended_Rad [mil]
  oval 70x80 hole 40: 1(-120,-120) 2(-20,-120) 3(80,-120)
  round 130 hole 60: 2(-20,130)
  silkscreen extent -320,-170 280,270, body extent -315,-165 275,265, height 997
Transformer_ETD34 [mm]
  oval 6x3.5 hole 2.5: 1(-20.066,15.621) 2(-20.066,10.627) 3(-20.066,5.461) 4(-20.066,0.381) 5(-20.066,-4.613) 6(-20.066,-9.779) 7(-20.066,-14.859) 8(20.193,-14.986) 9(20.193,-9.906) 10(20.193,-4.74) 11(20.193,0.254) 12(20.193,5.334) 13(20.193,10.5) 14(20.193,15.494)
  oval 5x3 hole 1.524: 1(-12.7,15.494) 2(-12.7,10.5) 3(-12.7,5.334) 4(-12.7,0.254) 5(-12.7,-4.74) 6(-12.7,-9.906) 7(-12.7,-14.986) 8(12.573,-14.986) 9(12.573,-9.906) 10(12.573,-4.74) 11(12.573,0.254) 12(12.573,5.334) 13(12.573,10.5) 14(12.573,15.494)
  Top Layer lines w4: -21.844,15.494 -21.443,15.494 -20.066,15.494 -12.7,15.494 -11.447,15.494 ; -21.717,-14.986 -21.443,-14.986 -20.066,-14.986 -12.7,-14.986 -11.32,-14.986 ; -21.717,-9.906 -20.066,-9.906 -12.7,-9.906 -11.32,-9.906 ; -21.717,-4.699 -20.066,-4.699 -12.7,-4.699 -11.32,-4.699 ; -21.717,0.254 -20.066,0.254 -12.7,0.254 -11.32,0.254 ; -21.717,5.334 -20.066,5.334 -12.7,5.334 -11.32,5.334 ; -21.717,10.541 -11.32,10.541 ; 11.176,-14.986 12.573,-14.986 20.193,-14.986 21.573,-14.986 ; 11.176,-9.906 12.573,-9.906 20.193,-9.906 21.573,-9.906 ; 11.176,-4.74 12.573,-4.74 20.193,-4.74 20.409,-4.74 21.573,-4.74 ; 11.176,0.254 19.312,0.254 21.573,0.254 ; 11.176,5.334 12.573,5.334 20.193,5.334 21.573,5.334 ; 11.176,10.5 12.573,10.5 20.193,10.5 21.573,10.5 ; 11.176,15.494 12.573,15.494 20.193,15.494 21.037,15.494 21.573,15.494
  Bottom Layer lines w1.5: -21.734,-4.74 -21.037,-4.74 -20.066,-4.74 -12.7,-4.74 -11.337,-4.74 ; -21.734,0.254 -20.066,0.254 -12.7,0.254 -11.337,0.254
  Bottom Layer lines w3: -21.734,15.494 -20.193,15.494 -20.066,15.494 -12.7,15.494 -11.337,15.494
  Bottom Layer lines w4: -21.734,-14.986 -20.066,-14.986 -12.7,-14.986 -11.7,-14.986 -11.337,-14.986 ; -21.734,-9.906 -21.443,-9.906 -20.767,-9.906 -20.193,-9.906 -20.066,-9.906 -12.7,-9.906 -11.337,-9.906 ; -21.734,5.334 -20.066,5.334 -12.7,5.334 -11.337,5.334 ; -21.734,10.5 -11.337,10.5 ; 11.159,-14.986 12.573,-14.986 20.193,-14.986 21.556,-14.986 ; 11.159,-9.906 12.573,-9.906 20.193,-9.906 21.556,-9.906 ; 11.159,-4.74 12.573,-4.74 17,-4.74 20.193,-4.74 20.863,-4.74 21.556,-4.74 ; 11.159,0.254 21.556,0.254 ; 11.159,5.334 12.573,5.334 20.193,5.334 21.556,5.334 ; 11.159,10.5 12.573,10.5 20.193,10.5 21.443,10.5 21.556,10.5 ; 11.159,15.494 12.573,15.494 20.193,15.494 21.037,15.494 21.556,15.494
  silkscreen extent -23.75,-20.32 24.13,20.07, body extent -20.11,-20 20.11,20, height 34.58
US1G_SMA [mm]
  rect 2.5x1.7 smd paste+0 mask+0: 1(-2,0) 2(2,0)
  silkscreen extent -3.93,-1.46 2.3,1.46, body extent -2.6,-1.3 2.6,1.3, height 2.4
WE-PD2_1054 [mm] "SMD Power Inductor, 2-Leads, body 10x9mm"
  rect 3.75x9.5 smd: 1(-3.125,0) 2(3.125,0)
  silkscreen extent -5.62,-0.12 -5.37,0.12, body extent -5.04,-4.5 5.04,4.5, height 5.43

## Part data
C1 C19: library part CAP_polar_Hitano
C2 C4 C6 C9 C18 C20 C21 C22 C23 C28 C30 C31 C34 C35 C36 C39 C41 C43 C47: library part CAP-NON-POLAR
C5 C8 C29 C32 C33 C37 C38 C45: library part CAP-POLAR
C24 C25 C26: library part CAP-V
C27 C40: library part CMP-1036-04552-2, "CAP CER 0.22UF 50V X7R 0805", Capacitance="0.22 μF", Manufacturer=KEMET, Manufacturer Part Number=C0805C224K5RACTU, Package=C0805C-DN, Temperature="-55°C to +125°C", Temperature Characteristic=X7R, Temperature Coefficient=30ppm/°C, Temperature Range High=+125°C, Temperature Range Low=-55°C, Tolerance=0.1, Voltage Rating="50 V", Automotive=No, Category=Cap, ComponentLink2Description=Datasheet, ComponentLink2URL=https://content.kemet.com/datasheets/KEM_C1003_C0G_SMD.pdf, Device Class L1="Passive Components", Device Class L2=Capacitors, Device Class L3="Ceramic Capacitors", Digikey Description="CAP CER 0.22UF 50V X7R 0805", Height=0.88mm, Ipc Land Pattern Name=CAPC200125X78, Lead Free=Yes, Material=Ceramic, Mouser Description="CAP CER 0.22UF 50V X7R 0805", Octopart=https://octopart.com/c0805c224k5ractu-kemet-144670, RoHS=TRUE
C44 C46: library part CAP_POL_SMD
D2 D18: library part SS36_Schottky
D7 D8 D9 D10 VD7 VD8 VD9 VD10 VD11: library part 1N4148, "Fast Switching Diode, 100 V, 0.15 A, -65 to 150 degC, 2-Pin?SOD123, RoHS, Tape and Reel", If - Forward Current=0.15A, Ir - Reverse Current=1uA, Manufacturer=DiodesIncorporated, Max Surge Current=2A, Maximum Operating Temperature=+150C, Minimum Operating Temperature=-65C, Operating Temperature Range=-65Cto+150C, Package / Case=SOD-123, Package Reference=SOD123-2, Peak Reverse Voltage=100V, Vf - Forward Voltage=1.25V, Brand=DiodesIncorporated, Configuration=Single, Datasheet URL=http://www.farnell.com/datasheets/1915529.pdf, Datasheet Version="Rev. 24-2, 10/2013", Factory Pack Quantity=3000, Height=1.25mm, Length=2.85mm, Manufacturer URL=http://www.diodes.com/, Mounting Style=SMD/SMT, Package URL=http://www.diodes.com/datasheets/ds18004.pdf, Packaging=Reel, Product=SwitchingDiodes, Product Category=Diodes-GeneralPurpose,Power,Switching, Recovery Time=4ns, RoHS=True, Series=1N4148, Type=SwitchingDiode, Unit Weight=0.000353oz, Width=1.7mm
D17: library part CMP-02541-000026-1, "DIODE ZENER 8.2V 500MW DO35", Case/Package=DO-35, Max Operating Temperature=175°C, Max Power Dissipation=500mW, Max Reverse Leakage Current=100nA, Min Operating Temperature=-65°C, Package Quantity=30000, Test Current=5mA, Tolerance=2%, Zener Voltage=8.2V, Contact Plating=Tin, Element Configuration=Single, ESD Protection=No, Impedance=7R, Lead Free="Lead Free", Mount="Through Hole", Number of Pins=2, Packaging="Ammo Pack", Power Dissipation=500mW, Radiation Hardening=No, RoHS Compliant=Yes, Series="Automotive, AEC-Q101", Voltage Tolerance=2%
D19 D20 D21: library part LED, "WURTH ELEKTRONIK - 151031YS06000 - LED, Yellow, Through Hole, T-1 (3mm), 30 mA, 2 V, 590 nm", Manufacturer_Name="Wurth Elektronik", Manufacturer_Part_Number=151031YS06000, Mouser Part Number=710-151031YS06000, Datasheet Link=https://katalog.we-online.de/led/datasheet/151031YS06000.pdf, Geometry.Height=5.5mm, Mouser Price/Stock=https://www.mouser.co.uk/ProductDetail/Wurth-Elektronik/151031YS06000?qs=LlUlMxKIyB3xSYYW%252BcuBiQ%3D%3D
J1: "WR-TBL Series 101 Horizontal Entry Modular, THT, pitch 5mm, 2p", Manufacturer="Wurth Elektronik", Operating Temperature Max=105°C, Operating Temperature Min=-40°C, Rated Current=16A, Working Voltage=250V, Application="Pressure Clamp", Category="Terminal Blocks", ComponentLink1Description="Website Link", ComponentLink1URL=https://www.we-online.com/redexpert/article/691101710002?ad, ComponentLink2Description="Datasheet Link", ComponentLink2URL=https://www.we-online.com/redexpert/spec/691101710002?ad, Manufacturer Part Number=691101710002, Match Code=WR-TBL, Modularity=Yes, Mount="Through Hole", Number of Pins=2, Number of Rows=1, Orientation=Horizontal, Packaging=Box, Pitch=5mm
J2 J3 J4: "WR-TBL Series 102 Horizontal Entry Modular, THT, pitch 5mm, 2p", Manufacturer="Wurth Elektronik", Operating Temperature Max=105°C, Operating Temperature Min=-40°C, Rated Current=15A, Working Voltage=250V, Application="Pressure Clamp", Category="Terminal Blocks", ComponentLink1Description="Website Link", ComponentLink1URL=https://www.we-online.com/redexpert/article/691102710002?ad, ComponentLink2Description="Datasheet Link", ComponentLink2URL=https://www.we-online.com/redexpert/spec/691102710002?ad, Manufacturer Part Number=691102710002, Match Code=WR-TBL, Modularity=Yes, Mount="Through Hole", Number of Pins=2, Number of Rows=1, Orientation=Horizontal, Packaging=Box, Pitch=5mm
K1: library part F1CA005V, "F1CA005V"
L1 L2 L3 L5 L6 L7 L8 L9 L10 L11: library part 744776012, "WE-PD2 SMT Power Inductor, size 1054, 1.2µH, 7.4A, 0.006Ω", Case/Size Code=1054, DC Resistance=0.004Ω, DC Resistance Max=0.006Ω, Inductance=1.2µH, Manufacturer="Wurth Elektronik", Operating Temperature Max=125°C, Operating Temperature Min=-40°C, Rated Current=7.4A, Saturation Current=11A, Self Resonant Frequency=110MHz, Category="Unshielded Power Inductors", ComponentLink1Description="Website Link", ComponentLink1URL=https://www.we-online.com/redexpert/article/744776012?ad, ComponentLink2Description="Datasheet Link", ComponentLink2URL=https://www.we-online.com/redexpert/spec/744776012?ad, Height=5.4mm, Length=10mm, Manufacturer Part Number=744776012, Match Code=WE-PD2, Mount="Surface Mount", Packaging="Tape and Reel", Width=9mm, Simulation ModelName=1054_744776012_1.2u, Simulation ModelText=".subckt 1054_744776012_1.2u 1 2 / Rp 1 2 3008.47196972 / Cp 1 2 1.94370161067p / Rs 1 N3 0.006 / L1 N3 2 1.2u / .ends 1054_744776012_1.2u", Simulation PortMap=(1:1),(2:2)
L4 L12: library part 744776122, "WE-PD2 SMT Power Inductor, size 1054, 22µH, 2.04A, 0.1Ω", Case/Size Code=1054, DC Resistance=0.051Ω, DC Resistance Max=0.1Ω, Inductance=22µH, Manufacturer="Wurth Elektronik", Operating Temperature Max=125°C, Operating Temperature Min=-40°C, Rated Current=2.04A, Saturation Current=2.07A, Self Resonant Frequency=16MHz, Category="Unshielded Power Inductors", ComponentLink1Description="Website Link", ComponentLink1URL=https://www.we-online.com/redexpert/article/744776122?ad, ComponentLink2Description="Datasheet Link", ComponentLink2URL=https://www.we-online.com/redexpert/spec/744776122?ad, Height=5.4mm, Length=10mm, Manufacturer Part Number=744776122, Match Code=WE-PD2, Mount="Surface Mount", Packaging="Tape and Reel", Width=9mm, Simulation ModelName=1054_744776122_22u, Simulation ModelText=".subckt 1054_744776122_22u 1 2 / Rp 1 2 22000 / Cp 1 2 4.3p / Rs 1 N3 0.0511 / L1 N3 2 22u / .ends 1054_744776122_22u", Simulation PortMap=(1:1),(2:2)
P1 P2: "WR-WTB THT Male Vertical Locking Header, pitch 2.54mm, 3pins", Contact Resistance=20mΩ, Manufacturer="Wurth Elektronik", Operating Temperature Max=105°C, Operating Temperature Min=-40°C, Rated Current=3A, Withstanding Voltage=1000VAC, Working Voltage=250VAC, Category="Wire-to-Board Connectors", ComponentLink1Description="Website Link", ComponentLink1URL=https://www.we-online.com/redexpert/article/61900311121?ad, ComponentLink2Description="Datasheet Link", ComponentLink2URL=https://www.we-online.com/redexpert/spec/61900311121?ad, Gender=Male, Height=11.5mm, Length=7.62mm, Manufacturer Part Number=61900311121, Match Code=WR-WTB, Mount="Through Hole", Number of Pins=3, Number of Rows=1, Orientation=Vertical, Packaging=Bag, Pitch=2.54mm, Width=5.8mm
Q1: library part CMP-65434-000005-1, "OPTOISOLATOR 5KV TRANS 4SMD", Case/Package=SMD/SMT, Collector Emitter Saturation Voltage=200mV, Collector Emitter Voltage (VCEO)=80V, Forward Current=50mA, Forward Voltage=1.4V, Isolation Voltage=5kV, Max Operating Temperature=100°C, Max Power Dissipation=200mW, Min Operating Temperature=-30°C, Output Current per Channel=30mA, Package Quantity=2000, Reverse Breakdown Voltage=6V, Collector-emitter Voltage-Max=200mV, Contact Plating=Copper, Fall Time=18000ns, Input Current=50mA, Input Type=DC, Isolation Voltage-Max=5kV, Lead Free="Lead Free", Max Collector Current=50mA, Max Input Current=50mA, Max Output Voltage=80V, Mount="Surface Mount", Number of Channels=1, Number of Elements=1, Number of Pins=4, Output Voltage=80V, Packaging="Tape and Reel", Power Dissipation=200mW, Radiation Hardening=No, Rise Time=18000ns, RoHS Compliant=Yes
R1 R5 R6 R7 R8 R9 R10 R16 R22 R23 R24 R27 R29 R30 R38 R42 R43 R44 R45 R46: library part RES-CONST
R2 R40 R41: library part RES-CONST, "1K"
R3 R4: library part RES_1210
R13 R14 R15 R25 R26 R35: library part RES-CONST, "10K"
R17 R18: library part RES-CONST, "100K"
R31 R34 R36: library part RES_Adj
R32 R33: library part RES-CONST, "1-K"
TP1 TP2 TP3 TP4 TP5 TP6 TP7 TP8 TP9 TP10 TP11 TP13 TP14 TP15 TP16 TP17 TP19 TP20 TP22 TP23 TP24 TP25 TP26 TP27 TP28 TP29 TP30 TP31 TP32 TP33 TP34 TP35 TP36 TP37 TP38 TP39 TP40 TP42 TP43 TP44 TP45 TP46 TP47 TP48 TP50: library part TP_PCB?, "Test_Point"
U1 U5: library part LM2576D2T-005G
U2: library part Half_Bridge_PWM
U3: library part TL431_SOT-23-3, "TL431_SOT-23-3"
U4: library part CMP-1310-00291-2, "IC OPAMP GP 2 CIRCUIT 8SOIC", Case/Package=SOIC, Dual Supply Voltage=9V, Input Bias Current=250nA, Input Offset Voltage (Vos)=7mV, Max Dual Supply Voltage=16V, Max Operating Temperature=70°C, Max Supply Voltage=32V, Min Dual Supply Voltage=1.5V, Min Operating Temperature=0°C, Min Supply Voltage=3V, Nominal Supply Current=1.2mA, Operating Supply Current=1.5mA, Output Current=40mA, Package Quantity=2500, Power Supply Rejection Ratio (PSRR)=65dB, Voltage Gain=100dB, Bandwidth=1MHz, Common Mode Rejection Ratio=65dB, Contact Plating=Tin, Gain Bandwidth Product=1MHz, Halogen Free="Halogen Free", Height=1.5mm, Lead Free="Lead Free", Length=5mm, Number of Amplifiers=2, Number of Channels=2, Number of Circuits=2, Number of Elements=2, Number of Pins=8, Operating Supply Voltage=16V, Output Current per Channel=40mA, Packaging="Tape and Reel", Radiation Hardening=No, REACH SVHC="No SVHC", Slew Rate=0.6V/µs, Width=4mm
VD2: library part Suppressor
VD3 VD4: library part ESD_Unidirect
VD5: library part ZENER

## Via types
v1: diameter 0.8, hole 0.5, Top Layer to Bottom Layer, tented both sides, 14 vias
v2: diameter 2, hole 1.5, Top Layer to Bottom Layer, tented both sides, 4 vias
v3: diameter 2, hole 1, Top Layer to Bottom Layer, tented both sides, 2 vias
v4: diameter 1.8, hole 1, Top Layer to Bottom Layer, tented both sides, 1 vias

## Nets (pads, with @x,y where several pads share a name; then routed paths per layer and width w, separated by ;. In a path a pad name is that pad's centre, name@x,y a point inside that pad or via, vN(x,y) a via of type N, cw(c..) or ccw(c..) an arc to the next point about the centre after c; other vN are vias at no path point)
+20V: C43.2 C45.1 J2.1 L11.2 R30.2 R33.2 R38.2 R44.2 TP48.1 | length 84.3
  Top Layer w1: L11.2@201.45,73.425 202.244,74.219 v1(202.244,78.175) ; R44.2@235.275,64.725 235.275,64.159 243.95,55.484 243.95,55.425 J2.1@244.425,54.95
  Top Layer w2: L11.2@201.45,73.425 200.627,69.675 200.627,67.251 ccw(c204.495,67.251) 201.758,64.517 211.25,55.025 C45.1@212.175,55.025
  Bottom Layer w1: R33.2@200.466,80.225 202.275,80.225 ; R33.2@200.466,80.25 TP48.1@200.466,82.04 TP48.1@200.499,82.074 ; v1@202.275,78.206 202.275,80.225 ; R38.2@204.952,82.05 R30.2@204.952,80.225 202.275,80.225
  Bottom Layer w1.5: C45.1@212.5,55 J2.1@244.375,55
+550V: C11.1 C13.1 C15.2 R7.2 R13.2 R14.2 R15.2 RT1.1 VT1.2 | length 206.3
  Top Layer w2: RT1.1@5.85,12.625 11.431,7.044 11.434,7.041 ccw(c19.258,14.864) 19.258,3.8 19.261,3.8 27.559,3.8 27.562,3.8 ccw(c27.562,13.488) 34.414,6.639 37.117,9.342 ccw(c31.488,14.973) 39.45,14.973 39.45,26.577 39.45,26.58 cw(c59.958,26.58) 45.458,41.083 C11.1@49.65,45.275 ; VT1.2@90.88,67.865 90.88,65.965 90.88,60.291 ccw(c93.77,60.291) 91.727,58.247 ; 92.123,57.851 92.689,57.012 cw(c90.248,55.976) 92.9,55.976 92.9,54.125 ; C15.2@92.9,49.691 92.9,54.125 ; v3(114.05,54.125) 92.9,54.125 ; R14.2@147.112,56.35 R14.2@147.15,56.387 ; R13.2@159.75,56.387 R13.2@159.787,56.425
  Top Layer w3: C11.1@49.65,45.275 C13.1@73.7,45.275 ; C13.1@73.75,45.225 82.114,45.225 82.118,45.225 ccw(c82.118,60.473) C15.2@92.9,49.691
  Bottom Layer w2: v3(114.05,54.125) 141.738,54.125 141.741,54.125 ccw(c141.741,61.722) R14.2@147.112,56.35 ; R14.2@147.15,56.387 R13.2@159.75,56.387